# Altium PCB leader_2nd_try.PcbDoc
Units mm, origin at the board's own origin, x right, y up, seen from the top; angles counter-clockwise.
Board outline 66 x 74 mm, 2 copper layers (Top Layer, Bottom Layer); 34 components, 44 nets, 193 pads, 74 vias.
Unrouted connection lines stored in the file: 2.
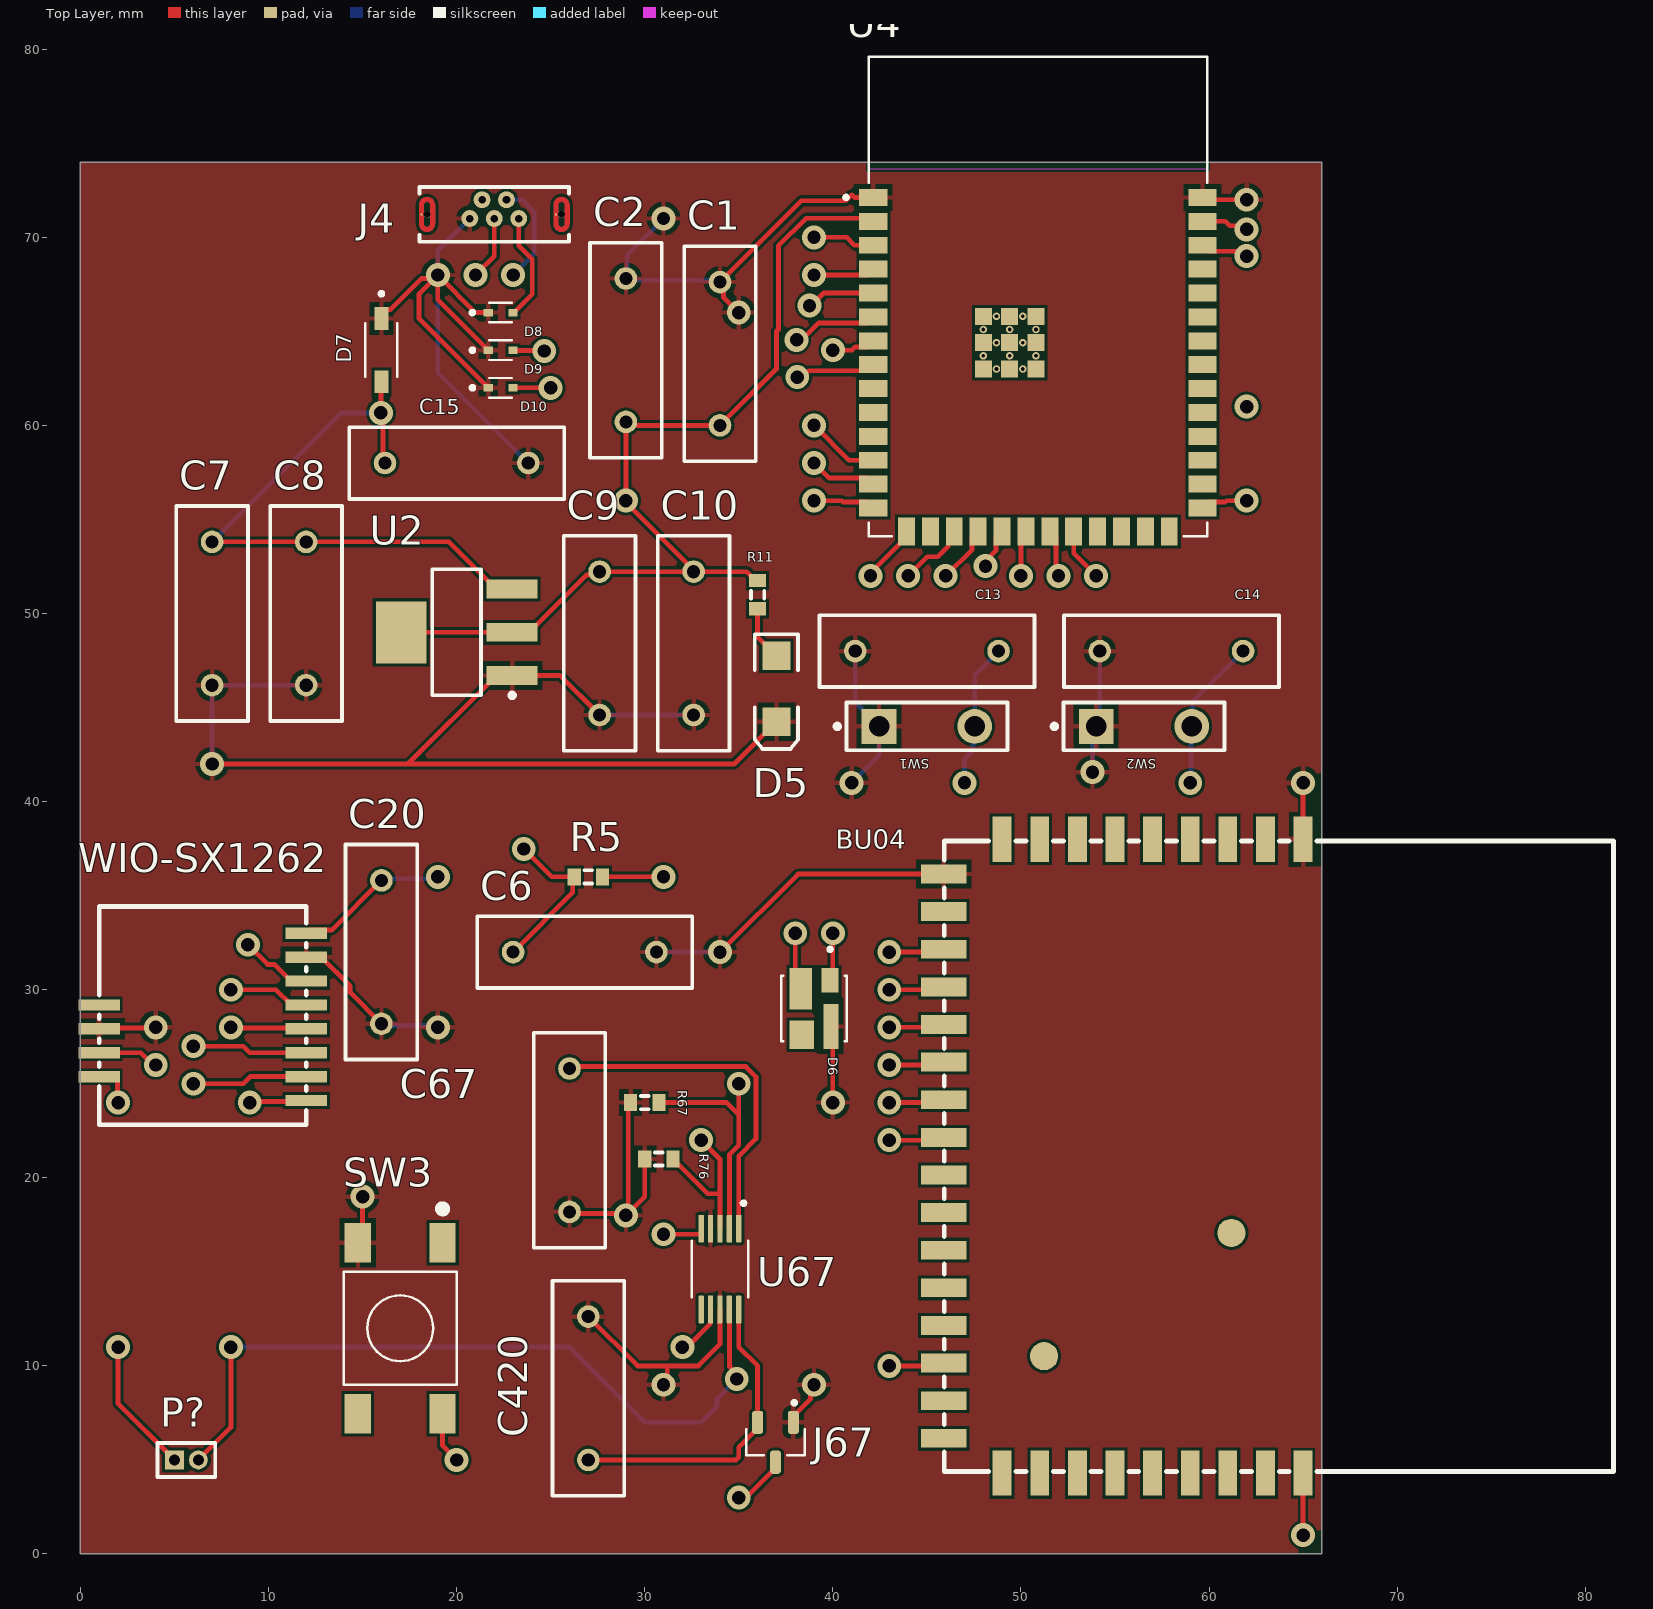
[diagram p0: Top Layer view]
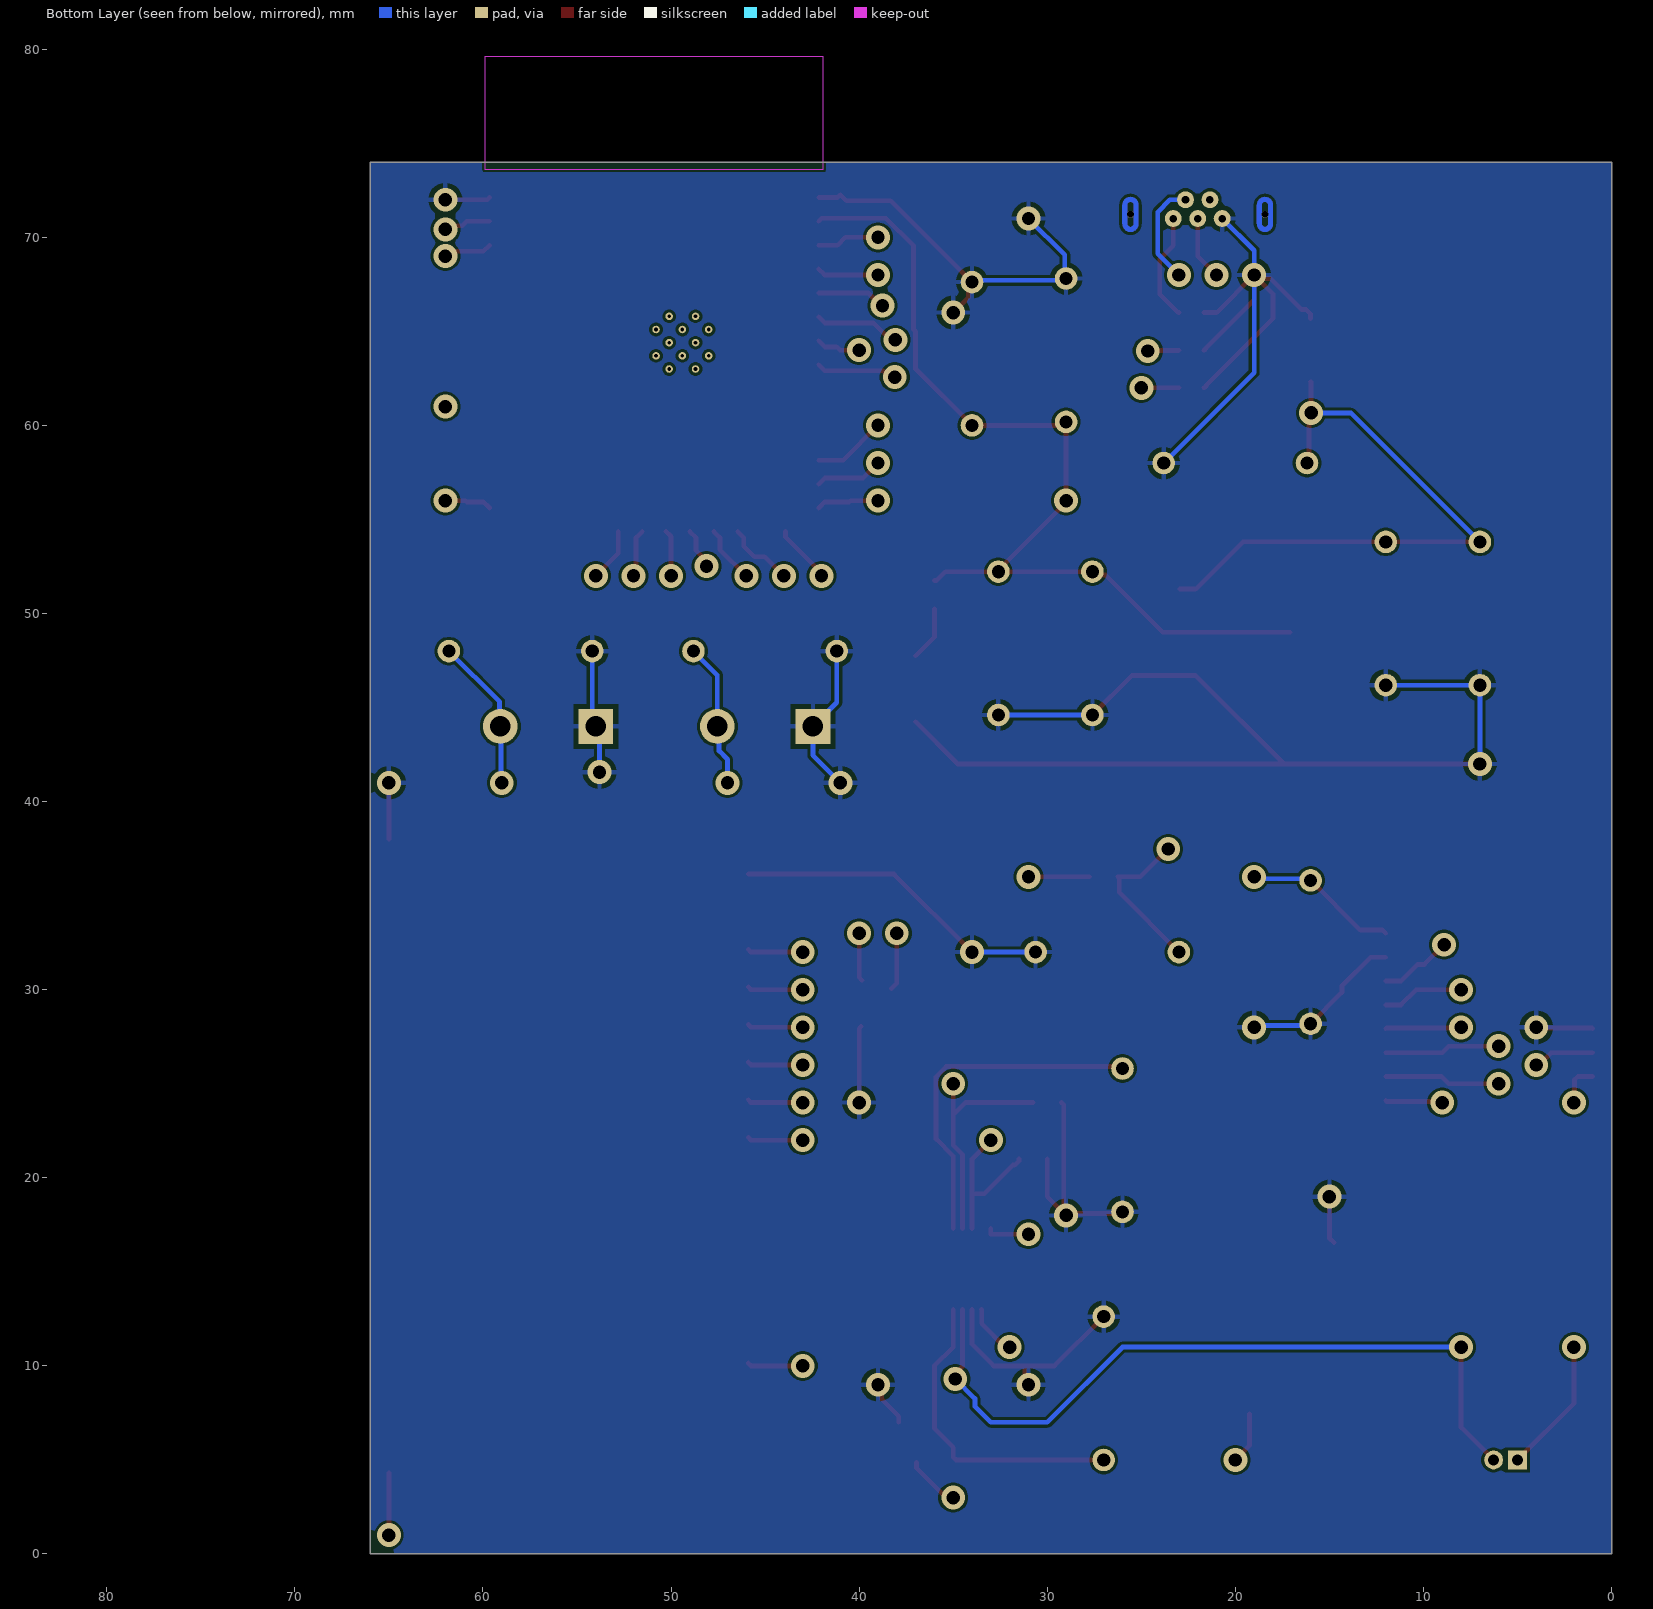
[diagram p1: Bottom Layer view, seen from below]

## Layer stack, top to bottom
Top Solder: solder mask 0.0102, Solder Resist, Dk 3.5
Top Layer: signal copper 0.0356
Dielectric 1: dielectric 0.32, FR-4, Dk 4.8
Bottom Layer: signal copper 0.0356
Bottom Solder: solder mask 0.0102, Solder Resist, Dk 3.5

## Board outline
0,0 66,0 66,74 0,74

## Design rules (kind name [scope] priority, off if disabled: settings)
Clearance Clearance_BGA_U1 [InComponent('U1')] p1: gap=0.1 ignorepadtopadclearanceinfootprint=FALSE
Clearance [All] p2: gap=0.15 ignorepadtopadclearanceinfootprint=FALSE
PolygonConnect [All] p1: connectstyle=Relief reliefconductorwidth=0.254 reliefentries=4 polygonreliefangle="90 Angle" airgapwidth=0.254
RoutingVias [All] p1: holewidth=0.711 width=1.27 viastyle="Through Hole" minholewidth=0.711 minwidth=1.27 maxholewidth=0.711 maxwidth=1.27
SolderMaskExpansion [All] p1: expansion=0 istentingtop=FALSE
SupplyNets "Schematic Supply Nets_1" [InNet('+5')] p1: voltage=0.000
SupplyNets "Schematic Supply Nets" [InNet('GND')] p2: voltage=0.000
Width Width_BGA_U1 [InComponent('U1')] p1: maxlimit=0.127 minlimit=0.127 preferedwidth=0.127 minimp=50.000000 maximp=50.000000 favimp=50.000000
Width [All] p2: maxlimit=0.254 minlimit=0.254 preferedwidth=0.254
30 further rules are at their usual default settings.

## Classes and differential pairs
component class LEADER_DEVICE: BU04 C20 SW3 WIO-SX1262
component class ESP32S3WROOM1: C6 C7 C8 C9 C10 C13 C14 C15 D5 D6 D7 D8 D9 D10 J4 R5 R11 SW1 SW2 U2 U4

## Components (designator, comment, footprint, x,y, rotation, side; value= is the part's Value field where it differs from the comment)
BU04 "7.9872GHz；6.4896GHz" WIRELM-SMD_BU04 55.45,21.15 r270 top
C1 "Cap" RAD-0.3#1 34,63.81 r270 top value=10uF
C2 "Cap" RAD-0.3#1 29,64 r270 top value=1uF
C6 "Cap" RAD-0.3#1 26.81,32 r180 top value=1uF
C7 "Cap" RAD-0.3#1 7,50 r90 top value=10uF
C8 "Cap" RAD-0.3#1 12,50 r90 top value=.1uF
C9 "Cap" RAD-0.3#1 27.6,48.415 r90 top value=.1uF
C10 "Cap" RAD-0.3#1 32.6,48.415 r90 top value=10uF
C13 "Cap" RAD-0.3#1 45,48 r180 top value=.1uF
C14 "Cap" RAD-0.3#1 58,48 r180 top value=.1uF
C15 "Cap" RAD-0.3#1 20,58 r180 top value=10uF
C20 "Cap" RAD-0.3#1 16,32 r270 top value=1uF
C67 "Cap" RAD-0.3#1 26,22 r90 top value=1uF
C420 "Cap" RAD-0.3#2 27,8.81 r90 top value=1uF
D5 "LED2" 3.2X1.6X1.1 37,46 r270 top
D6 "SK6812MINI-012" LED_SK6812MINI-012 39,29 r270 top
D7 "1N5819HW-7-F" SOD3715X145N 16,64 r270 top
D8 "LESD5D5.0CT1G" TVS_LESD5D5.0CT1G 22.34,66 r0 top
D9 "LESD5D5.0CT1G" TVS_LESD5D5.0CT1G 22.34,64 r0 top
D10 "LESD5D5.0CT1G" TVS_LESD5D5.0CT1G 22.34,62 r0 top
J4 "USB3130-XX-X_REVD" GCT_USB3130-XX-X_REVD 22,71.22 r180 top
J67 "MCP1700T-5002E/TT" SOT95P237X112-3N 36.95,5.94 r270 top
P? "Header 2" MHDR1X2 5,5 r0 top
R5 "Res3" J1-0603 27,36 r0 top value=10K
R11 "Res3" J1-0603 36,51 r90 top value=5.1K
R67 "Res3" J1-0603 30,24 r180 top value=4.7K
R76 "Res3" J1-0603 30.75,21 r0 top value=4.7K
SW1 "NTC013-AT1J-A160T" SPST-2 45,44 r0 top
SW2 "NTC013-AT1J-A160T" SPST-2 56.54,44 r0 top
SW3 "4-1437565-9" TE_4-1437565-9 17,12 r270 top
U2 "SGM2212-3.3XKC3G/TR" SOT223_M 20,49 r180 top
U4 "ESP32-S3-WROOM-1" XCVR_ESP32S3WROOM1N8R8 50.9,66.86 r0 top
U67 "DRV2605LDGST" SOP50P490X110-10N 34,15.15 r270 top
WIO-SX1262 "WIO-SX1262" WIRELM-SMD_WIO-SX1262 6.5,28.555 r90 top

## Footprints (in the part's own frame and the unit in brackets; to place one, negate y for a bottom-side part, rotate by r counter-clockwise, add the part's x,y. Pads: shape width x height; smd on the part's side, far side on the other; paste and mask are expansions set on the pad)
3.2X1.6X1.1 [mm] "SMT LED; 2 Flat Leads"
  rect 1.5x1.5 smd: 1(-1.75,0) 2(1.75,0)
  silkscreen extent -2.9,-1.15 3.2,1.15
GCT_USB3130-XX-X_REVD [mm]
  round 0.9 hole 0.4: 1(-1.3,0.22) 2(-0.65,-0.78) 3(0,0.22) 4(0.65,-0.78) 5(1.3,0.22)
  rect 0.1x0.1 smd paste-1 mask+0: 6(-3.275,0) 7(3.875,0)
  round 0.35 hole 0.35 unplated: ""(-3.575,0) ""(3.575,0)
  Top Layer region: 4,-0.5 3.999,-0.522 3.998,-0.544 3.995,-0.566 3.991,-0.588 3.986,-0.61 3.979,-0.631 3.972,-0.652 3.963,-0.673 3.954,-0.693 3.943,-0.713 3.931,-0.731 3.919,-0.75 3.905,-0.767 3.891,-0.784 3.876,-0.801 3.859,-0.816 3.842,-0.83 3.825,-0.844 3.806,-0.856 3.788,-0.868 3.768,-0.879 3.748,-0.888 3.727,-0.897 3.706,-0.904 3.685,-0.911 3.663,-0.916 3.641,-0.92 3.619,-0.923 3.597,-0.924 3.575,-0.925 3.553,-0.924 3.531,-0.923 3.509,-0.92 3.487,-0.916 3.465,-0.911 3.444,-0.904 3.423,-0.897 3.402,-0.888 3.382,-0.879 3.362,-0.868 3.344,-0.856 3.325,-0.844 3.308,-0.83 3.291,-0.816 3.274,-0.801 3.259,-0.784 3.245,-0.767 3.231,-0.75 3.219,-0.731 3.207,-0.712 3.196,-0.693 3.187,-0.673 3.178,-0.652 3.171,-0.631 3.164,-0.61 3.159,-0.588 3.155,-0.566 3.152,-0.544 3.151,-0.522 3.15,-0.5 3.15,0 3.4,0 3.4,-0.5 3.4,-0.509 3.401,-0.518 3.402,-0.527 3.404,-0.536 3.406,-0.545 3.409,-0.554 3.412,-0.563 3.415,-0.571 3.419,-0.579 3.423,-0.587 3.428,-0.595 3.433,-0.603 3.439,-0.61 3.445,-0.617 3.451,-0.624 3.458,-0.63 3.465,-0.636 3.472,-0.642 3.48,-0.647 3.487,-0.652 3.496,-0.656 3.504,-0.66 3.512,-0.663 3.521,-0.666 3.53,-0.669 3.539,-0.671 3.548,-0.673 3.557,-0.674 3.566,-0.675 3.584,-0.675 3.593,-0.674 3.602,-0.673 3.611,-0.671 3.62,-0.669 3.629,-0.666 3.638,-0.663 3.646,-0.66 3.654,-0.656 3.663,-0.652 3.67,-0.647 3.678,-0.642 3.685,-0.636 3.692,-0.63 3.699,-0.624 3.705,-0.617 3.711,-0.61 3.717,-0.603 3.722,-0.595 3.727,-0.588 3.731,-0.579 3.735,-0.571 3.738,-0.563 3.741,-0.554 3.744,-0.545 3.746,-0.536 3.748,-0.527 3.749,-0.518 3.75,-0.509 3.75,-0.5 3.75,0 4,0
  Top Layer region: 3.597,0.924 3.619,0.923 3.641,0.92 3.663,0.916 3.685,0.911 3.706,0.904 3.727,0.897 3.748,0.888 3.768,0.879 3.788,0.868 3.806,0.856 3.825,0.844 3.842,0.83 3.859,0.816 3.876,0.801 3.891,0.784 3.905,0.767 3.919,0.75 3.931,0.731 3.943,0.713 3.954,0.693 3.963,0.673 3.972,0.652 3.979,0.631 3.986,0.61 3.991,0.588 3.995,0.566 3.998,0.544 3.999,0.522 4,0.5 4,0 3.75,0 3.75,0.5 3.75,0.509 3.749,0.518 3.748,0.527 3.746,0.536 3.744,0.545 3.741,0.554 3.738,0.563 3.735,0.571 3.731,0.579 3.727,0.588 3.722,0.595 3.717,0.603 3.711,0.61 3.705,0.617 3.699,0.624 3.692,0.63 3.685,0.636 3.678,0.642 3.67,0.647 3.663,0.652 3.654,0.656 3.646,0.66 3.638,0.663 3.629,0.666 3.62,0.669 3.611,0.671 3.602,0.673 3.593,0.674 3.584,0.675 3.566,0.675 3.557,0.674 3.548,0.673 3.539,0.671 3.53,0.669 3.521,0.666 3.512,0.663 3.504,0.66 3.496,0.656 3.487,0.652 3.48,0.647 3.472,0.642 3.465,0.636 3.458,0.63 3.451,0.624 3.445,0.617 3.439,0.61 3.433,0.603 3.428,0.595 3.423,0.587 3.419,0.579 3.415,0.571 3.412,0.563 3.409,0.554 3.406,0.545 3.404,0.536 3.402,0.527 3.401,0.518 3.4,0.509 3.4,0.5 3.4,0 3.15,0 3.15,0.5 3.151,0.522 3.152,0.544 3.155,0.566 3.159,0.588 3.164,0.61 3.171,0.631 3.178,0.652 3.187,0.673 3.196,0.693 3.207,0.712 3.219,0.731 3.231,0.75 3.245,0.767 3.259,0.784 3.274,0.801 3.291,0.816 3.308,0.83 3.325,0.844 3.344,0.856 3.362,0.868 3.382,0.879 3.402,0.888 3.423,0.897 3.444,0.904 3.465,0.911 3.487,0.916 3.509,0.92 3.531,0.923 3.553,0.924 3.575,0.925
  Top Layer region: -3.15,-0.5 -3.151,-0.522 -3.152,-0.544 -3.155,-0.566 -3.159,-0.588 -3.164,-0.61 -3.171,-0.631 -3.178,-0.652 -3.187,-0.673 -3.196,-0.693 -3.207,-0.712 -3.219,-0.731 -3.231,-0.75 -3.245,-0.767 -3.259,-0.784 -3.274,-0.801 -3.291,-0.816 -3.308,-0.83 -3.325,-0.844 -3.344,-0.856 -3.362,-0.868 -3.382,-0.879 -3.402,-0.888 -3.423,-0.897 -3.444,-0.904 -3.465,-0.911 -3.487,-0.916 -3.509,-0.92 -3.531,-0.923 -3.553,-0.924 -3.575,-0.925 -3.597,-0.924 -3.619,-0.923 -3.641,-0.92 -3.663,-0.916 -3.685,-0.911 -3.706,-0.904 -3.727,-0.897 -3.748,-0.888 -3.768,-0.879 -3.788,-0.868 -3.806,-0.856 -3.825,-0.844 -3.842,-0.83 -3.859,-0.816 -3.876,-0.801 -3.891,-0.784 -3.905,-0.767 -3.919,-0.75 -3.931,-0.731 -3.943,-0.713 -3.954,-0.693 -3.963,-0.673 -3.972,-0.652 -3.979,-0.631 -3.986,-0.61 -3.991,-0.588 -3.995,-0.566 -3.998,-0.544 -3.999,-0.522 -4,-0.5 -4,0 -3.75,0 -3.75,-0.5 -3.75,-0.509 -3.749,-0.518 -3.748,-0.527 -3.746,-0.536 -3.744,-0.545 -3.741,-0.554 -3.738,-0.563 -3.735,-0.571 -3.731,-0.579 -3.727,-0.588 -3.722,-0.595 -3.717,-0.603 -3.711,-0.61 -3.705,-0.617 -3.699,-0.624 -3.692,-0.63 -3.685,-0.636 -3.678,-0.642 -3.67,-0.647 -3.663,-0.652 -3.654,-0.656 -3.646,-0.66 -3.638,-0.663 -3.629,-0.666 -3.62,-0.669 -3.611,-0.671 -3.602,-0.673 -3.593,-0.674 -3.584,-0.675 -3.566,-0.675 -3.557,-0.674 -3.548,-0.673 -3.539,-0.671 -3.53,-0.669 -3.521,-0.666 -3.512,-0.663 -3.504,-0.66 -3.496,-0.656 -3.487,-0.652 -3.48,-0.647 -3.472,-0.642 -3.465,-0.636 -3.458,-0.63 -3.451,-0.624 -3.445,-0.617 -3.439,-0.61 -3.433,-0.603 -3.428,-0.595 -3.423,-0.587 -3.419,-0.579 -3.415,-0.571 -3.412,-0.563 -3.409,-0.554 -3.406,-0.545 -3.404,-0.536 -3.402,-0.527 -3.401,-0.518 -3.4,-0.509 -3.4,-0.5 -3.4,0 -3.15,0
  Top Layer region: -3.553,0.924 -3.531,0.923 -3.509,0.92 -3.487,0.916 -3.465,0.911 -3.444,0.904 -3.423,0.897 -3.402,0.888 -3.382,0.879 -3.362,0.868 -3.344,0.856 -3.325,0.844 -3.308,0.83 -3.291,0.816 -3.274,0.801 -3.259,0.784 -3.245,0.767 -3.231,0.75 -3.219,0.731 -3.207,0.712 -3.196,0.693 -3.187,0.673 -3.178,0.652 -3.171,0.631 -3.164,0.61 -3.159,0.588 -3.155,0.566 -3.152,0.544 -3.151,0.522 -3.15,0.5 -3.15,0 -3.4,0 -3.4,0.5 -3.4,0.509 -3.401,0.518 -3.402,0.527 -3.404,0.536 -3.406,0.545 -3.409,0.554 -3.412,0.563 -3.415,0.571 -3.419,0.579 -3.423,0.587 -3.428,0.595 -3.433,0.603 -3.439,0.61 -3.445,0.617 -3.451,0.624 -3.458,0.63 -3.465,0.636 -3.472,0.642 -3.48,0.647 -3.487,0.652 -3.496,0.656 -3.504,0.66 -3.512,0.663 -3.521,0.666 -3.53,0.669 -3.539,0.671 -3.548,0.673 -3.557,0.674 -3.566,0.675 -3.584,0.675 -3.593,0.674 -3.602,0.673 -3.611,0.671 -3.62,0.669 -3.629,0.666 -3.638,0.663 -3.646,0.66 -3.654,0.656 -3.663,0.652 -3.67,0.647 -3.678,0.642 -3.685,0.636 -3.692,0.63 -3.699,0.624 -3.705,0.617 -3.711,0.61 -3.717,0.603 -3.722,0.595 -3.727,0.588 -3.731,0.579 -3.735,0.571 -3.738,0.563 -3.741,0.554 -3.744,0.545 -3.746,0.536 -3.748,0.527 -3.749,0.518 -3.75,0.509 -3.75,0.5 -3.75,0 -4,0 -4,0.5 -3.999,0.522 -3.998,0.544 -3.995,0.566 -3.991,0.588 -3.986,0.61 -3.979,0.631 -3.972,0.652 -3.963,0.673 -3.954,0.693 -3.943,0.713 -3.931,0.731 -3.919,0.75 -3.905,0.767 -3.891,0.784 -3.876,0.801 -3.859,0.816 -3.842,0.83 -3.825,0.844 -3.806,0.856 -3.788,0.868 -3.768,0.879 -3.748,0.888 -3.727,0.897 -3.706,0.904 -3.685,0.911 -3.663,0.916 -3.641,0.92 -3.619,0.923 -3.597,0.924 -3.575,0.925
  Bottom Layer region: 4,-0.5 3.999,-0.522 3.998,-0.544 3.995,-0.566 3.991,-0.588 3.986,-0.61 3.979,-0.631 3.972,-0.652 3.963,-0.673 3.954,-0.693 3.943,-0.713 3.931,-0.731 3.919,-0.75 3.905,-0.767 3.891,-0.784 3.876,-0.801 3.859,-0.816 3.842,-0.83 3.825,-0.844 3.806,-0.856 3.788,-0.868 3.768,-0.879 3.748,-0.888 3.727,-0.897 3.706,-0.904 3.685,-0.911 3.663,-0.916 3.641,-0.92 3.619,-0.923 3.597,-0.924 3.575,-0.925 3.553,-0.924 3.531,-0.923 3.509,-0.92 3.487,-0.916 3.465,-0.911 3.444,-0.904 3.423,-0.897 3.402,-0.888 3.382,-0.879 3.362,-0.868 3.344,-0.856 3.325,-0.844 3.308,-0.83 3.291,-0.816 3.274,-0.801 3.259,-0.784 3.245,-0.767 3.231,-0.75 3.219,-0.731 3.207,-0.712 3.196,-0.693 3.187,-0.673 3.178,-0.652 3.171,-0.631 3.164,-0.61 3.159,-0.588 3.155,-0.566 3.152,-0.544 3.151,-0.522 3.15,-0.5 3.15,0 3.4,0 3.4,-0.5 3.4,-0.509 3.401,-0.518 3.402,-0.527 3.404,-0.536 3.406,-0.545 3.409,-0.554 3.412,-0.563 3.415,-0.571 3.419,-0.579 3.423,-0.587 3.428,-0.595 3.433,-0.603 3.439,-0.61 3.445,-0.617 3.451,-0.624 3.458,-0.63 3.465,-0.636 3.472,-0.642 3.48,-0.647 3.487,-0.652 3.496,-0.656 3.504,-0.66 3.512,-0.663 3.521,-0.666 3.53,-0.669 3.539,-0.671 3.548,-0.673 3.557,-0.674 3.566,-0.675 3.584,-0.675 3.593,-0.674 3.602,-0.673 3.611,-0.671 3.62,-0.669 3.629,-0.666 3.638,-0.663 3.646,-0.66 3.654,-0.656 3.663,-0.652 3.67,-0.647 3.678,-0.642 3.685,-0.636 3.692,-0.63 3.699,-0.624 3.705,-0.617 3.711,-0.61 3.717,-0.603 3.722,-0.595 3.727,-0.588 3.731,-0.579 3.735,-0.571 3.738,-0.563 3.741,-0.554 3.744,-0.545 3.746,-0.536 3.748,-0.527 3.749,-0.518 3.75,-0.509 3.75,-0.5 3.75,0 4,0
  Bottom Layer region: 3.597,0.924 3.619,0.923 3.641,0.92 3.663,0.916 3.685,0.911 3.706,0.904 3.727,0.897 3.748,0.888 3.768,0.879 3.788,0.868 3.806,0.856 3.825,0.844 3.842,0.83 3.859,0.816 3.876,0.801 3.891,0.784 3.905,0.767 3.919,0.75 3.931,0.731 3.943,0.713 3.954,0.693 3.963,0.673 3.972,0.652 3.979,0.631 3.986,0.61 3.991,0.588 3.995,0.566 3.998,0.544 3.999,0.522 4,0.5 4,0 3.75,0 3.75,0.5 3.75,0.509 3.749,0.518 3.748,0.527 3.746,0.536 3.744,0.545 3.741,0.554 3.738,0.563 3.735,0.571 3.731,0.579 3.727,0.588 3.722,0.595 3.717,0.603 3.711,0.61 3.705,0.617 3.699,0.624 3.692,0.63 3.685,0.636 3.678,0.642 3.67,0.647 3.663,0.652 3.654,0.656 3.646,0.66 3.638,0.663 3.629,0.666 3.62,0.669 3.611,0.671 3.602,0.673 3.593,0.674 3.584,0.675 3.566,0.675 3.557,0.674 3.548,0.673 3.539,0.671 3.53,0.669 3.521,0.666 3.512,0.663 3.504,0.66 3.496,0.656 3.487,0.652 3.48,0.647 3.472,0.642 3.465,0.636 3.458,0.63 3.451,0.624 3.445,0.617 3.439,0.61 3.433,0.603 3.428,0.595 3.423,0.587 3.419,0.579 3.415,0.571 3.412,0.563 3.409,0.554 3.406,0.545 3.404,0.536 3.402,0.527 3.401,0.518 3.4,0.509 3.4,0.5 3.4,0 3.15,0 3.15,0.5 3.151,0.522 3.152,0.544 3.155,0.566 3.159,0.588 3.164,0.61 3.171,0.631 3.178,0.652 3.187,0.673 3.196,0.693 3.207,0.712 3.219,0.731 3.231,0.75 3.245,0.767 3.259,0.784 3.274,0.801 3.291,0.816 3.308,0.83 3.325,0.844 3.344,0.856 3.362,0.868 3.382,0.879 3.402,0.888 3.423,0.897 3.444,0.904 3.465,0.911 3.487,0.916 3.509,0.92 3.531,0.923 3.553,0.924 3.575,0.925
  Bottom Layer region: -3.15,-0.5 -3.151,-0.522 -3.152,-0.544 -3.155,-0.566 -3.159,-0.588 -3.164,-0.61 -3.171,-0.631 -3.178,-0.652 -3.187,-0.673 -3.196,-0.693 -3.207,-0.712 -3.219,-0.731 -3.231,-0.75 -3.245,-0.767 -3.259,-0.784 -3.274,-0.801 -3.291,-0.816 -3.308,-0.83 -3.325,-0.844 -3.344,-0.856 -3.362,-0.868 -3.382,-0.879 -3.402,-0.888 -3.423,-0.897 -3.444,-0.904 -3.465,-0.911 -3.487,-0.916 -3.509,-0.92 -3.531,-0.923 -3.553,-0.924 -3.575,-0.925 -3.597,-0.924 -3.619,-0.923 -3.641,-0.92 -3.663,-0.916 -3.685,-0.911 -3.706,-0.904 -3.727,-0.897 -3.748,-0.888 -3.768,-0.879 -3.788,-0.868 -3.806,-0.856 -3.825,-0.844 -3.842,-0.83 -3.859,-0.816 -3.876,-0.801 -3.891,-0.784 -3.905,-0.767 -3.919,-0.75 -3.931,-0.731 -3.943,-0.713 -3.954,-0.693 -3.963,-0.673 -3.972,-0.652 -3.979,-0.631 -3.986,-0.61 -3.991,-0.588 -3.995,-0.566 -3.998,-0.544 -3.999,-0.522 -4,-0.5 -4,0 -3.75,0 -3.75,-0.5 -3.75,-0.509 -3.749,-0.518 -3.748,-0.527 -3.746,-0.536 -3.744,-0.545 -3.741,-0.554 -3.738,-0.563 -3.735,-0.571 -3.731,-0.579 -3.727,-0.588 -3.722,-0.595 -3.717,-0.603 -3.711,-0.61 -3.705,-0.617 -3.699,-0.624 -3.692,-0.63 -3.685,-0.636 -3.678,-0.642 -3.67,-0.647 -3.663,-0.652 -3.654,-0.656 -3.646,-0.66 -3.638,-0.663 -3.629,-0.666 -3.62,-0.669 -3.611,-0.671 -3.602,-0.673 -3.593,-0.674 -3.584,-0.675 -3.566,-0.675 -3.557,-0.674 -3.548,-0.673 -3.539,-0.671 -3.53,-0.669 -3.521,-0.666 -3.512,-0.663 -3.504,-0.66 -3.496,-0.656 -3.487,-0.652 -3.48,-0.647 -3.472,-0.642 -3.465,-0.636 -3.458,-0.63 -3.451,-0.624 -3.445,-0.617 -3.439,-0.61 -3.433,-0.603 -3.428,-0.595 -3.423,-0.587 -3.419,-0.579 -3.415,-0.571 -3.412,-0.563 -3.409,-0.554 -3.406,-0.545 -3.404,-0.536 -3.402,-0.527 -3.401,-0.518 -3.4,-0.509 -3.4,-0.5 -3.4,0 -3.15,0
  Bottom Layer region: -3.553,0.924 -3.531,0.923 -3.509,0.92 -3.487,0.916 -3.465,0.911 -3.444,0.904 -3.423,0.897 -3.402,0.888 -3.382,0.879 -3.362,0.868 -3.344,0.856 -3.325,0.844 -3.308,0.83 -3.291,0.816 -3.274,0.801 -3.259,0.784 -3.245,0.767 -3.231,0.75 -3.219,0.731 -3.207,0.712 -3.196,0.693 -3.187,0.673 -3.178,0.652 -3.171,0.631 -3.164,0.61 -3.159,0.588 -3.155,0.566 -3.152,0.544 -3.151,0.522 -3.15,0.5 -3.15,0 -3.4,0 -3.4,0.5 -3.4,0.509 -3.401,0.518 -3.402,0.527 -3.404,0.536 -3.406,0.545 -3.409,0.554 -3.412,0.563 -3.415,0.571 -3.419,0.579 -3.423,0.587 -3.428,0.595 -3.433,0.603 -3.439,0.61 -3.445,0.617 -3.451,0.624 -3.458,0.63 -3.465,0.636 -3.472,0.642 -3.48,0.647 -3.487,0.652 -3.496,0.656 -3.504,0.66 -3.512,0.663 -3.521,0.666 -3.53,0.669 -3.539,0.671 -3.548,0.673 -3.557,0.674 -3.566,0.675 -3.584,0.675 -3.593,0.674 -3.602,0.673 -3.611,0.671 -3.62,0.669 -3.629,0.666 -3.638,0.663 -3.646,0.66 -3.654,0.656 -3.663,0.652 -3.67,0.647 -3.678,0.642 -3.685,0.636 -3.692,0.63 -3.699,0.624 -3.705,0.617 -3.711,0.61 -3.717,0.603 -3.722,0.595 -3.727,0.588 -3.731,0.579 -3.735,0.571 -3.738,0.563 -3.741,0.554 -3.744,0.545 -3.746,0.536 -3.748,0.527 -3.749,0.518 -3.75,0.509 -3.75,0.5 -3.75,0 -4,0 -4,0.5 -3.999,0.522 -3.998,0.544 -3.995,0.566 -3.991,0.588 -3.986,0.61 -3.979,0.631 -3.972,0.652 -3.963,0.673 -3.954,0.693 -3.943,0.713 -3.931,0.731 -3.919,0.75 -3.905,0.767 -3.891,0.784 -3.876,0.801 -3.859,0.816 -3.842,0.83 -3.825,0.844 -3.806,0.856 -3.788,0.868 -3.768,0.879 -3.748,0.888 -3.727,0.897 -3.706,0.904 -3.685,0.911 -3.663,0.916 -3.641,0.92 -3.619,0.923 -3.597,0.924 -3.575,0.925
  silkscreen extent -3.98,-1.45 3.98,1.45
J1-0603 [mm] "Chip Resistor, Body 1.6x0.8mm, IPC High Density"
  rect 0.7x0.9 smd: 1(-0.75,0) 2(0.75,0)
  silkscreen extent -0.2,-0.35 0.2,0.35, body extent -0.85,-0.48 0.85,0.48, height 0.9
LED_SK6812MINI-012 [mm]
  rect 1.3x0.9 smd: 1(-1.5,0.85)
  rect 2.2x1.2 smd: 2(-1.05,-0.7)
  rect 1.5x1.3 smd: 3(1.4,-0.65)
  rect 2.4x0.8 smd: 4(0.95,0.9)
  silkscreen extent -3.25,-1.75 1.75,1.75, body extent -1.85,-1.75 1.85,1.75, height 1.1
MHDR1X2 [mm] "Connector; Header; 2 Position"
  rect 1x1 hole 0.6: 1(0,0)
  round 1 hole 0.6: 2(1.27,0)
  silkscreen extent -0.9,-0.9 2.17,0.9
RAD-0.3#1 [mm] "Radial Cap, Thru-Hole; 2 Leads; 0.3 in Pin Spacing"
  round 1.2 hole 0.7: 1(-3.81,0) 2(3.81,0)
  silkscreen extent -5.72,-1.91 5.71,1.9
RAD-0.3#2 [mm] "Radial Cap, Thru-Hole; 2 Leads; 0.3 in Pin Spacing"
  round 1.2 hole 0.7: 1(-3.81,0) g(3.81,0)
  silkscreen extent -5.71,-1.91 5.71,1.91
SOD3715X145N [mm]
  rect 1.21x0.73 smd: A(1.68,0) C(-1.68,0)
  silkscreen extent -3.1,-0.85 1.43,0.85, body extent -1.83,-0.77 1.83,0.77, height 0.8
SOP50P490X110-10N [mm]
  rrect25% 1.47x0.28 smd paste+0 mask+0.102: 1(-2.15,1) 2(-2.15,0.5) 3(-2.15,0) 6(2.15,-1) 7(2.15,-0.5) 8(2.15,0) 9(2.15,0.5) 10(2.15,1) gnd(-2.15,-0.5) gpio2(-2.15,-1)
  silkscreen extent -3.6,-1.5 1.5,1.5, body extent -2.45,-1.5 2.45,1.5, height 1.1
SOT95P237X112-3N [mm]
  rrect50% 1.23x0.59 smd: 1(-1.06,0.95) 2(-1.06,-0.95) 3(1.06,0)
  silkscreen extent -2.2,-1.56 0.7,1.56, body extent -1.18,-1.45 1.18,1.45, height 1.12
SOT223_M [mm] "SOT223, 4-Leads, Body 6.5x3.5mm, Pitch 2.3mm, Lead Span 7mm, IPC Low Density"
  rect 2.7x1 smd: 1(-2.95,2.3) 2(-2.95,0) 3(-2.95,-2.3)
  rect 2.7x3.3 smd: 4(2.95,0)
  silkscreen extent -3.08,-3.35 1.3,3.47, body extent -1.85,-3.35 1.85,3.35, height 1.7
SPST-2 [mm] "Switch; 2 Leads"
  rect 1.85x1.85 hole 1.1: 1(-2.54,0)
  round 1.85 hole 1.1: 2(2.54,0)
  silkscreen extent -4.89,-1.27 4.28,1.27
TE_4-1437565-9 [mm]
  rect 2.1x1.4 smd: 1(-4.55,2.25) 2(4.55,2.25) 3(-4.55,-2.25) 4(4.55,-2.25)
  silkscreen extent -6.55,-3 3,3, body extent -5,-3 5,3, height 7.26
TVS_LESD5D5.0CT1G [mm]
  rect 0.48x0.4 smd: 1(-0.66,0) 2(0.66,0)
  silkscreen extent -1.6,-0.52 0.6,0.52, body extent -0.8,-0.4 0.8,0.4, height 0.7
WIRELM-SMD_BU04 [mm]
  rect 2.4x1 smd paste+0 mask+0.051: 1(-16.85,9.55) 2(-16.85,7.55) 3(-16.85,5.55) 4(-16.85,3.55) 5(-16.85,1.55) 6(-16.85,-0.45) 7(-16.85,-2.45) 8(-16.85,-4.45) 9(-16.85,-6.45) 26(16.85,-6.45) 27(16.85,-4.45) 28(16.85,-2.45) 29(16.85,-0.45) 30(16.85,1.55) 31(16.85,3.55) 32(16.85,5.55) 33(16.85,7.55) 34(16.85,9.55)
  rect 1x2.4 smd paste+0 mask+0.051: 10(-15,-9.55) 11(-13,-9.55) 12(-11,-9.55) 13(-9,-9.55) 14(-7,-9.55) 15(-5,-9.55) 16(-3,-9.55) 17(-1,-9.55) 18(1,-9.55) 19(3,-9.55) 20(5,-9.55) 21(7,-9.55) 22(9,-9.55) 23(11,-9.55) 24(13,-9.55) 25(15,-9.55)
  round 1.5 smd paste+0 mask+0.051: 35(4.08,5.74) 36(10.63,-4.22)
  silkscreen extent -16.75,-9.52 16.76,26.05
WIRELM-SMD_WIO-SX1262 [mm]
  rect 0.6x2.2 smd paste+0 mask+0.051: 1(-4.445,-5.5) 2(-3.175,-5.5) 3(-1.905,-5.5) 4(-0.635,-5.5) 5(0.635,-5.5) 6(1.905,-5.5) 7(3.175,-5.5) 8(4.445,-5.5) 9(0.635,5.5) 10(-0.635,5.5) 11(-1.905,5.5) 12(-3.175,5.5)
  silkscreen extent -5.74,-5.5 5.86,5.5
XCVR_ESP32S3WROOM1N8R8 [mm]
  rect 1.5x0.9 smd: 1(-8.75,5.26) 2(-8.75,3.99) 3(-8.75,2.72) 4(-8.75,1.45) 5(-8.75,0.18) 6(-8.75,-1.09) 7(-8.75,-2.36) 8(-8.75,-3.63) 9(-8.75,-4.9) 10(-8.75,-6.17) 11(-8.75,-7.44) 12(-8.75,-8.71) 13(-8.75,-9.98) 14(-8.75,-11.25) 27(8.75,-11.25) 28(8.75,-9.98) 29(8.75,-8.71) 30(8.75,-7.44) 31(8.75,-6.17) 32(8.75,-4.9) 33(8.75,-3.63) 34(8.75,-2.36) 35(8.75,-1.09) 36(8.75,0.18) 37(8.75,1.45) 38(8.75,2.72) 39(8.75,3.99) 40(8.75,5.26)
  rect 0.9x1.5 smd: 15(-6.985,-12.5) 16(-5.715,-12.5) 17(-4.445,-12.5) 18(-3.175,-12.5) 19(-1.905,-12.5) 20(-0.635,-12.5) 21(0.635,-12.5) 22(1.905,-12.5) 23(3.175,-12.5) 24(4.445,-12.5) 25(5.715,-12.5) 26(6.985,-12.5)
  rect 0.9x0.9 smd: 41_1(-1.5,-2.46) 41_2(-2.9,-2.46) 41_3(-0.1,-2.46) 41_4(-2.9,-3.86) 41_5(-1.5,-3.86) 41_6(-0.1,-3.86) 41_7(-2.9,-1.06) 41_8(-1.5,-1.06) 41_9(-0.1,-1.06)
  round 0.4 hole 0.2 mask+0: 41_10(-1.5,-1.76) 41_11(-2.9,-1.76) 41_12(-0.1,-1.76) 41_13(-2.9,-3.16) 41_14(-1.5,-3.16) 41_15(-0.1,-3.16) 41_16(-2.2,-1.06) 41_17(-0.8,-1.06) 41_18(-2.2,-2.46) 41_19(-0.8,-2.46) 41_20(-2.2,-3.86) 41_21(-0.8,-3.86)
  Keep-Out Layer region: 9,6.75 -9,6.75 -9,12.75 9,12.75
  Keep-Out Layer region: 9,6.75 -9,6.75 -9,12.75 9,12.75
  silkscreen extent -10.3,-12.75 9,12.75, body extent -9,-12.75 9,12.75, height 3.25

## Part data
BU04: JLCPCB Part Class="Extended Part", Manufacturer=Ai-Thinker(安信可), Manufacturer Part=BU04, Contributor=lcsc, nameAlias=Value, spicePre=U, spiceSymbolName=BU04, Supplier=LCSC, Supplier Part=C42420050
C1 C2 C6 C7 C8 C9 C10 C13 C14 C15 C20 C67 C420: "Capacitor", LatestRevisionDate=17-Jul-2002, LatestRevisionNote="Re-released for DXP Platform.", PackageDescription="Radial Cap, Thru-Hole; 2 Leads; 0.3 in Pin Spacing", PackageReference=RAD-0.3, Published=8-Jun-2000, Publisher="Altium Limited"
D5: "Typical RED, GREEN, YELLOW, AMBER GaAs LED", LatestRevisionDate=17-Jul-2002, LatestRevisionNote="Re-released for DXP Platform.", PackageDescription="SM LED; 2 Flat Leads", PackageReference=3.2X1.6X1.1, PackageVersion=Feb-2002, Published=8-Jun-2000, Publisher="Altium Limited"
D6: "INTEGRATED LIGHT SOURCE INTELLIGENT CONTROL OF CHIP-ON-TOP SMD TYPE LED", Package=Package, Check_prices=https://www.snapeda.com/parts/SK6812MINI-012/DONGGUANG+OPSCO+OPTOELECTRONICS+CO.%252C+LTD/view-part/?ref=eda, MF="DONGGUANG OPSCO OPTOELECTRONICS CO., LTD", MP=SK6812MINI-012, SnapEDA_Link=https://www.snapeda.com/parts/SK6812MINI-012/DONGGUANG+OPSCO+OPTOELECTRONICS+CO.%252C+LTD/view-part/?ref=snap
D7: library part DIODE_S, Part Number=ES313000200000, Part Reference=D7, Part Type=Diode, PCB Footprint=SOD123
D8 D9 D10: library part DIODE_BI_DIR, Part Number=ES313200200000, Part Reference=D8, Part Type=Diode, PCB Footprint=SOD523
J4: "USB - micro B USB 2.0 Receptacle Connector 5 Position Through Hole", Package=None, Availability="In Stock", Check_prices=https://www.snapeda.com/parts/USB3130-30-A/Global+Connector+Technology/view-part/?ref=eda, MF="Global Connector Technology", MP=USB3130-30-A, Price=None, SnapEDA_Link=https://www.snapeda.com/parts/USB3130-30-A/Global+Connector+Technology/view-part/?ref=snap
J67: "MCP1700T-5002E/TT,LDOVoltage Regulator,250mA,5V +/-2%,2.3 to 6Vin,3-Pin SOT-23", Package="SOT-23 Microchip", Check_prices=https://www.snapeda.com/parts/MCP1700T-5002E/TT/Microchip/view-part/?ref=eda, MF=Microchip, MP=MCP1700T-5002E/TT, SnapEDA_Link=https://www.snapeda.com/parts/MCP1700T-5002E/TT/Microchip/view-part/?ref=snap
P?: "Header, 2-Pin", LatestRevisionDate=17-Jul-2002, LatestRevisionNote="Re-released for DXP Platform.", Publisher="Altium Limited"
R5 R11 R67 R76: "Resistor", LatestRevisionDate=29-May-2009, LatestRevisionNote="IPC-7351 Footprint Added.", PackageDescription="Chip Resistor", PackageReference=J1-0603, Published=8-Jun-2000, Publisher="Altium Limited"
SW1 SW2: library part SW_SP_4P, Part Number=ES511600400000, CLASS=DISCRETE, Part Type="Tact Switch", PCB Footprint=SW4-4P2X3P2X2P5-SMT, TIME=2004-11-29
  SW1: Part Reference=SW1
  SW2: Part Reference=SW2
SW3: "Alcoswitch, Switch, Tactile, 50 mA, SPST, Pushbutton, Off[On], FSM6JSMA", Contact_Current_Rating="50 mA", Package=None, Check_prices=https://www.snapeda.com/parts/FSM6JSMA/TE+Connectivity+ALCOSWITCH+Switches/view-part/?ref=eda, Configuration_Pole-Throw="Single Pole - Single Throw", EU_RoHS_Compliance=Compliant, MF="TE Connectivity", MP=FSM6JSMA, SnapEDA_Link=https://www.snapeda.com/parts/FSM6JSMA/TE+Connectivity+ALCOSWITCH+Switches/view-part/?ref=snap
U2: library part LDO1117, Part Number=ES411402000000, Part Reference=U2, Part Type="Power ICs", PCB Footprint=SOT223
U67: JLCPCB Part Class="Extended Part", Manufacturer=TI(德州仪器), Contributor=LCSC, Manufacturer Part=DRV2605LDGST, spicePre=U, spiceSymbolName=DRV2605LDGST, Supplier=LCSC, Supplier Part=C425927
WIO-SX1262: Manufacturer=null, Manufacturer Part=Wio-SX1262, Contributor=lcsc, spicePre=U, spiceSymbolName=WIO-SX1262, Supplier=LCSC, Supplier Part=C9900220371
U4: PCB Footprint=ESP32-S3-WROOM_NEW, Reference=U4

## Via types
v1: diameter 1.27, hole 0.711, Top Layer to Bottom Layer, 74 vias

## Nets (pads, with @x,y where several pads share a name; then routed paths per layer and width w, separated by ;. In a path a pad name is that pad's centre, name@x,y a point inside that pad or via, vN(x,y) a via of type N, cw(c..) or ccw(c..) an arc to the next point about the centre after c; other vN are vias at no path point)
+5: C7.2 C8.2 C15.2 D7.A D8.2 J4.1 J67.3 U2.3 | length 41.9
  Top Layer w0.254: C7.2 C8.2 19.59,53.81 22.1,51.3 U2.3 ; D7.A 15.984,62.304 15.984,60.681 v1(15.968,60.665) 16.079,60.554 16.079,58.111 C15.2 ; D8.2 23.04,66 24.016,66.976 24.016,68.844 23.3,69.56 J4.1 ; v1(35,3) 35.194,3.194 35.584,3.194 36.95,4.56 J67.3
  Bottom Layer w0.254: C7.2 13.855,60.665 v1(15.968,60.665)
CHIP_PU: C6.2 C14.1 R5.1 SW2.2 U4.3 | length 20.1
  Top Layer w0.254: C6.2 26.169,35.169 26.169,35.919 R5.1 25.052,36 v1(23.569,37.483) ; v1(39,70) 40.73,70 41.15,69.58 U4.3
  Bottom Layer w0.254: v1(59,41) 59.04,41.04 59.04,43.96 SW2.2 59.116,44.036 59.116,45.306 C14.1
DTR: 
ESP_3V3: BU04.23 BU04.34 C1.2 C2.2 C9.2 C10.2 C20.1 D6.2 R5.2 R11.2 U2.2 U2.4 U4.2 WIO-SX1262.8 | length 71.8
  Top Layer w0.254: WIO-SX1262.8 12.173,33.173 13.363,33.173 C20.1 ; U2.4@17.1,49 23.85,49 26.894,52.044 27.419,52.044 C9.2 C10.2 32.6,52.312 29,55.913 v1(29,56) 29,60 C1.2 37,63 37,65 37.105,65.105 37.105,69.542 38.579,71.016 41.984,71.016 U4.2 ; R5.2 v1(31,36) ; C10.2@32.856,52.225 35.425,52.225 35.9,51.75 R11.2 ; v1(38,33) 38,30.35 D6.2 ; v1(43,10) 45.75,10 BU04.23 ; v1(65,1) BU04.34
  Bottom Layer w0.254: C20.1 16.095,35.905 18.905,35.905 v1(19,36)
GND: BU04.1 BU04.10 C1.1 C2.1 C6.1 C7.1 C8.1 C9.1 C10.1 C13.2 C14.2 C15.1 C20.2 C67.1 C420.g D5.2 D6.4 D7.C D8.1 D9.1 D10.1 J4.5 J67.1 R67.2 R76.1 SW1.1 SW2.1 SW3.3 U2.1 U4.1 U4.40 U67.8 U67.gnd WIO-SX1262.7 WIO-SX1262.10 | length 197.3
  Top Layer w0.254: WIO-SX1262.10 1.04,27.96 3.96,27.96 v1(4,28) ; v1(7,42) 34.75,42 D5.2 ; WIO-SX1262.7 12.8,31.73 14.332,30.198 14.332,29.858 C20.2 ; SW3.3 15,16.8 v1(15,19) ; D7.C 16,65.92 16.238,66.158 16.478,66.158 18.126,67.806 v1@18.806,67.806 ; 17.4,42 22.1,46.7 25.505,46.7 C9.1 ; D10.1 21.64,62 21.567,62.073 21.567,62.113 18,65.68 18,67 v1@18.806,67.806 ; D9.1 21.64,64 21.567,64.073 21.567,64.113 19,66.68 v1(19,68) ; D8.1 21,66 v1(19,68) ; C67.1 26.095,18.095 28.905,18.095 v1(29,18) ; C420.g 29.62,10 31.236,10 ; R67.2 29.125,23.875 29.125,18.125 30,19 R76.1 ; v1(31,9) 31.194,9.194 31.194,9.959 31.236,10 ; U67.8 34,11.149 32.851,10 31.236,10 ; v1(34,32) 38.15,36.15 BU04.10 ; v1(35,66) 34.181,66.819 34.181,67.439 C1.1 38.327,71.947 40.677,71.947 41,72.27 41.15,72.12 U4.1 ; J67.1 37.9,7.32 38.806,8.226 38.806,8.806 v1(39,9) ; D6.4 40,27.95 v1(40,24) ; U4.40 59.77,72 v1(62,72) ; BU04.1 v1(65,41) ; v1@18.806,67.806 v1(19,68)
  Bottom Layer w0.254: v1(7,42) C7.1 C8.1 ; C20.2 16.095,28.095 18.905,28.095 v1(19,28) ; J4.5 19,69.3 v1(19,68) 19,62.81 C15.1 ; C9.1 C10.1 ; C6.1 v1(34,32) ; v1(31,71) 29.066,69.066 29.066,67.876 C2.1 29.095,67.715 33.905,67.715 C1.1 ; v1(41,41) 42.46,42.46 SW1.1 41.19,45.27 C13.2 ; v1(53.803,41.567) 53.803,43.803 SW2.1 54.19,44.19 C14.2
GPIO0: C13.1 SW1.2 U4.27 | length 10.3
  Top Layer w0.254: U4.27 59.973,55.933 60.868,55.933 60.935,56 v1(62,56)
  Bottom Layer w0.254: v1(47,41) 47,42.249 47.445,42.694 47.445,43.905 SW1.2 47.54,46.73 C13.1
GPIO1: R76.2 U4.39 U67.3 | length 11
  Top Layer w0.254: R76.2 31.5,20.9 31.723,20.677 31.823,20.677 33.35,19.15 34,19.15 ; v1(33,22) 34,21 34,19.15 ; U67.3 34,19.15 ; U4.39 60.857,70.85 61.093,70.614 61.806,70.614 v1(62,70.42)
GPIO2: U4.38 U67.gpio2 | length 4.9
  Top Layer w0.254: v1(31,17) 32.987,17 33,17.013 U67.gpio2 ; U4.38 59.973,69.257 61.468,69.257 61.725,69 v1(62,69)
GPIO3: SW3.2 U4.15 | length 5.9
  Top Layer w0.254: SW3.2 19.25,5.75 v1(20,5) ; v1(42,52) 42,52.145 43.915,54.06 U4.15
GPIO4: BU04.17 U4.4 | length 6.2
  Top Layer w0.254: v1(39,68) 41.84,68 U4.4 ; v1(43,22) 45.75,22 BU04.17
GPIO5: BU04.12 U4.5 | length 6.6
  Top Layer w0.254: v1(38.76,66.371) 38.859,66.371 39.528,67.04 U4.5 ; v1(43,32) 45.75,32 BU04.12
GPIO6: U4.6 WIO-SX1262.1 | length 7.6
  Top Layer w0.254: v1(9,24) 9.055,24.055 11.945,24.055 WIO-SX1262.1 ; v1(38.076,64.547) 38.351,64.547 39.251,65.447 41.827,65.447 U4.6
GPIO7: U4.7 WIO-SX1262.5 | length 6.7
  Top Layer w0.254: v1(8,30) 10.39,30 11.2,29.19 WIO-SX1262.5 ; v1(40,64) 41.016,64 41.193,64.177 41.827,64.177 U4.7
GPIO8: R67.1 U4.12 U67.2 | length 16.3
  Top Layer w0.254: R67.1 34.363,24 35,23.363 ; U67.2 34.5,21.225 35,21.725 35,23.363 ; v1(35,25) 35,23.363 ; v1(39,60) 40.85,58.15 U4.12
GPIO9: U4.17 WIO-SX1262.6 | length 7.6
  Top Layer w0.254: v1(8.9,32.391) 9.945,31.346 10.314,31.346 11.2,30.46 WIO-SX1262.6 ; v1(44,52) 45.016,53.016 45.58,53.016 46.132,53.568 46.132,54.037 U4.17
GPIO10: BU04.16 U4.18 | length 6
  Top Layer w0.254: v1(43,24) 45.75,24 BU04.16 ; v1(46,52) 47.402,53.402 47.402,54.037 U4.18
GPIO11: BU04.14 U4.19 WIO-SX1262.3 | length 11.3
  Top Layer w0.254: v1(6,27) 8.66,27 9.01,26.65 WIO-SX1262.3 ; v1(43,28) 45.75,28 BU04.14 ; v1(48.117,52.519) 48.117,52.793 48.672,53.348 48.672,54.037 U4.19
GPIO12: BU04.13 U4.20 WIO-SX1262.4 | length 9.7
  Top Layer w0.254: v1(8,28) 8.04,27.96 11.96,27.96 WIO-SX1262.4 ; v1(43,30) 45.75,30 BU04.13 ; v1@49.806,52.194 v1(50,52) 50,54.095 U4.20
GPIO13: BU04.15 U4.21 WIO-SX1262.2 | length 11.7
  Top Layer w0.254: v1(6,25) 8.645,25 9.025,25.38 WIO-SX1262.2 ; v1(43,26) 45.75,26 BU04.15 ; U4.21 51.858,54.037 51.858,52.142 v1(52,52)
GPIO14: U4.22 WIO-SX1262.11 | length 6.1
  Top Layer w0.254: WIO-SX1262.11 3.213,26.65 3.863,26 v1(4,26) ; U4.22 52.805,53.195 v1(54,52)
GPIO15: U4.8 WIO-SX1262.12 | length 6.6
  Top Layer w0.254: WIO-SX1262.12 1.8,25.38 1.973,25.207 1.973,24.027 v1(2,24) ; v1(38.108,62.571) 38.382,62.571 38.719,62.907 41.827,62.907 U4.8
GPIO19: D10.2 J4.3 J4.4 U4.13 | length 9
  Top Layer w0.254: v1(21,68) 22,69 J4.3 ; D10.2 v1(25,62) ; v1(39,58) 39.797,57.203 41.827,57.203 U4.13
GPIO20: D9.2 J4.2 U4.14 | length 10.6
  Top Layer w0.254: D9.2 23.02,63.98 24.637,63.98 v1(24.657,63.96) ; v1(39,56) 40.465,56 40.532,55.933 41.827,55.933 U4.14
  Bottom Layer w0.254: J4.2 22.656,71.994 23.481,71.994 24.131,71.344 24.131,69.131 v1(23,68)
GPIO38: D6.1 U4.31 | length 2.6
  Top Layer w0.254: D6.1 40,30.65 v1(40,33)
GPIO41: U4.33 U4.34
NetC3_2: 
NetC9_2: 
NetC12_2: 
NetC15_2: 
NetC21_2: 
NetC67_2: C67.2 U67.1 | length 18.6
  Top Layer w0.254: C67.2 26.102,25.912 35.378,25.912 35.912,25.378 35.912,22.066 35,21.154 U67.1
NetC420_1: C420.1 J67.2 U67.10 | length 16.7
  Top Layer w0.254: C420.1 34.851,5 35,5.149 35,5.68 36,6.68 J67.2 36,10 35,11 U67.10
NetD5_1: D5.1 R11.1 | length 2.9
  Top Layer w0.254: R11.1 36,48.75 D5.1
NetP?_2: P?.2 U67.9 | length 40.3
  Top Layer w0.254: P?.2 8,6.73 v1(8,11) ; U67.9 34.5,9.969 34.889,9.58 v1(34.889,9.305)
  Bottom Layer w0.254: v1(8,11) 26,11 30,7 33,7 33.847,7.847 33.847,8.264 v1(34.889,9.305)
NetQ1_1: 
NetQ2_1: 
NetR14_2: 
NetR16_2: 
RTS: P?.1 U67.7 | length 10
  Top Layer w0.254: v1(2,11) 2,8 P?.1 ; v1(32,11) 32.246,11 33.487,12.241 33.487,12.987 U67.7
U0RXD: U4.36
U0TXD: U4.37
USB_DN: 
USB_DP: 
VCC_5V: 
pads on no net: BU04.2 BU04.3 BU04.4 BU04.5 BU04.6 BU04.7 BU04.8 BU04.9 BU04.11 BU04.18 BU04.19 BU04.20 BU04.21 BU04.22 BU04.24 BU04.25 BU04.26 BU04.27 BU04.28 BU04.29 BU04.30 BU04.31 BU04.32 BU04.33 BU04.35 BU04.36 D6.3 J4. J4.6 J4.7 SW3.1 SW3.4 U4.9 U4.10 U4.11 U4.16 U4.23 U4.24 U4.25 U4.26 U4.28 U4.29 U4.30 U4.32 U4.35 U4.41_1 U4.41_2 U4.41_3 U4.41_4 U4.41_5 U4.41_6 U4.41_7 U4.41_8 U4.41_9 U4.41_10 U4.41_11 U4.41_12 U4.41_13 U4.41_14 U4.41_15 U4.41_16 U4.41_17 U4.41_18 U4.41_19 U4.41_20 U4.41_21 U67.6 WIO-SX1262.9
copper on no net:
  other v1: 62,61

## Polygon pours and split planes (outlines as drawn)
GND on Bottom Layer "GND_L02_P003" (solid, pour order 3): 0,0 66,0 66,74 0,74
GND on Top Layer "GND_L01_P004" (solid, pour order 4): 0,74 66,74 66,0 0,0

## Text inside footprints (layer, text, board x,y; h text height)
U4: Mechanical 13 "ANTENNA" at 46.4,76.36 h1.27